# Altium PCB HCD_PCB.PcbDoc (part 4 of 4)
Units mil, origin at the board's own origin, x right, y up, seen from the top; angles counter-clockwise.
Board outline 2762.03 x 3428.03 mil, 2 copper layers (Top Layer, Bottom Layer), stack 57 mil thick; 112 components, 73 nets, 363 pads, 145 vias.
Unrouted connection lines stored in the file: 1.
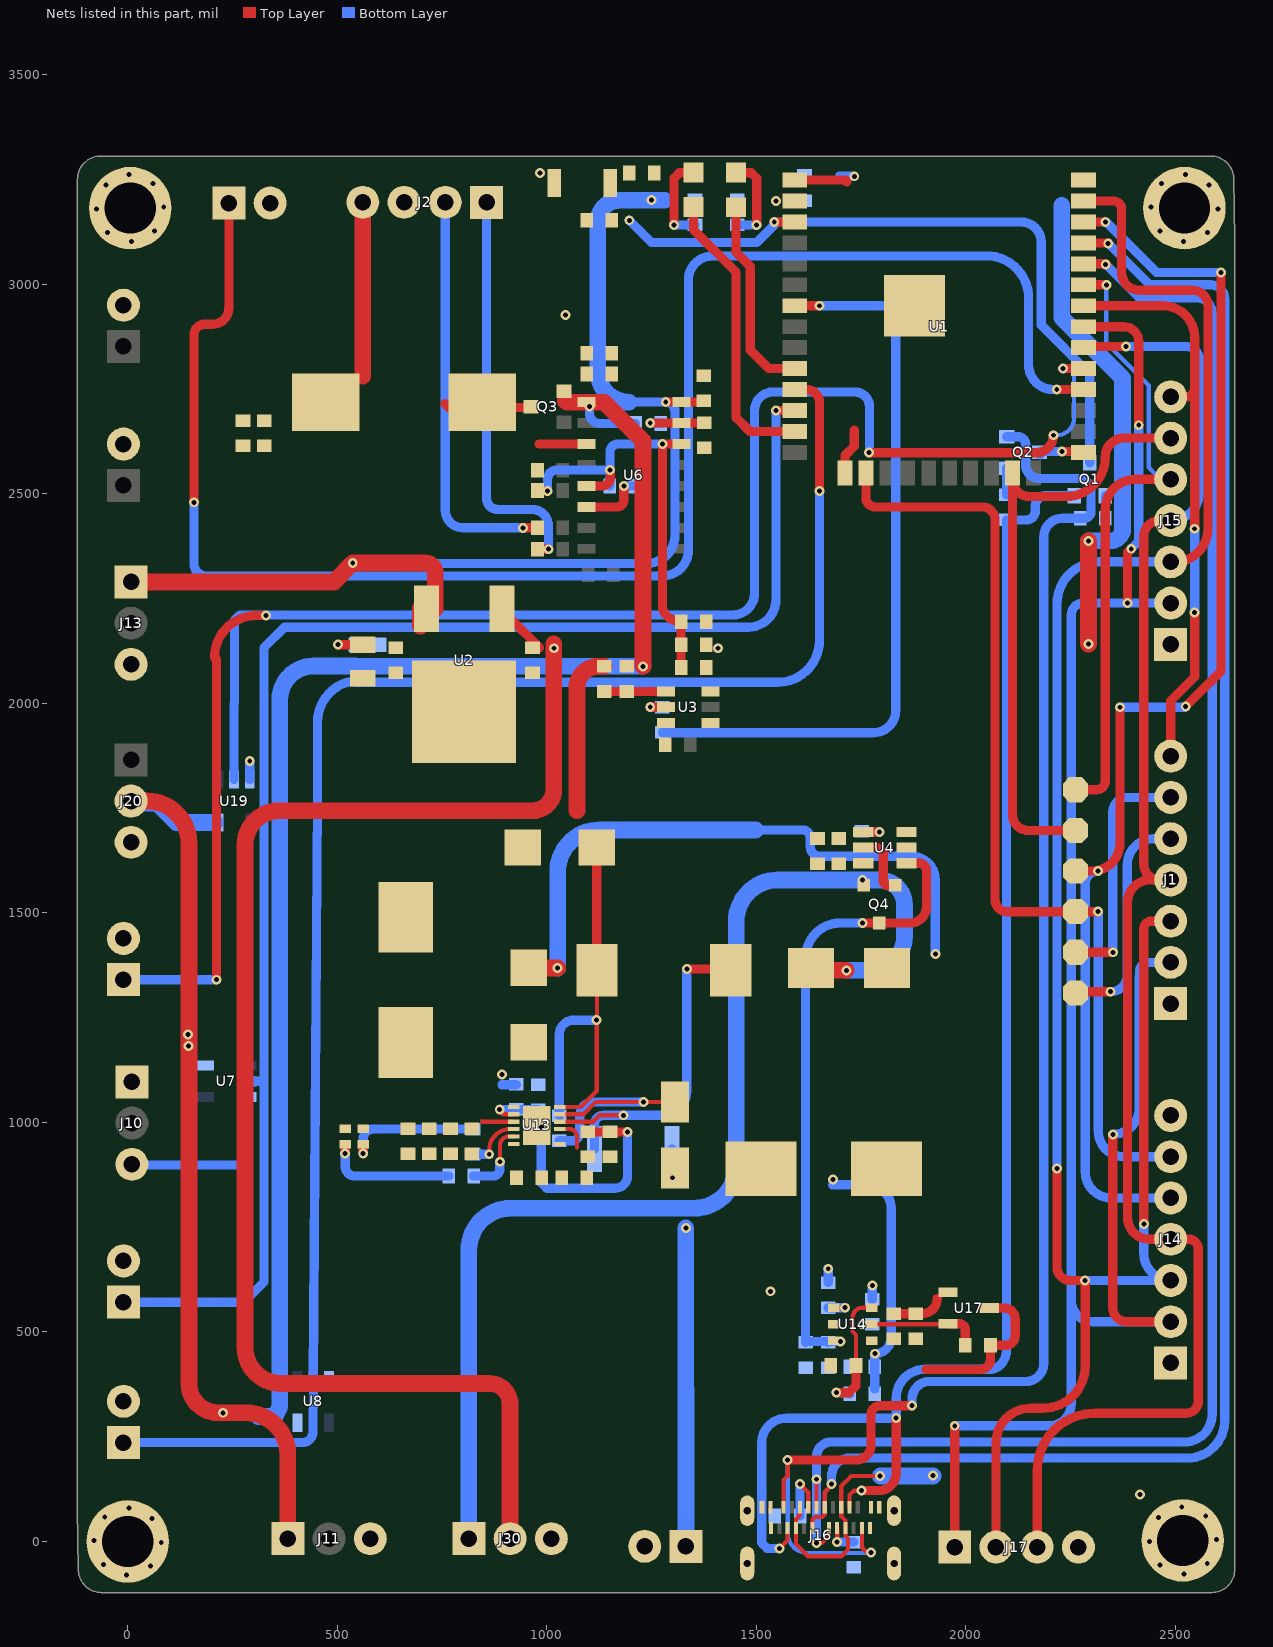
[diagram p2: the nets of this part, all layers, seen from the top]

## Via types
v1: diameter 23.62, hole 11.81, Top Layer to Bottom Layer, tented both sides, 100 vias
v2: diameter 23.62, hole 11.81, Top Layer to Bottom Layer, 45 vias

## Nets (pads, with @x,y where several pads share a name; then routed paths per layer and width w, separated by ;. In a path a pad name is that pad's centre, name@x,y a point inside that pad or via, vN(x,y) a via of type N, cw(c..) or ccw(c..) an arc to the next point about the centre after c; other vN are vias at no path point) (continued)
ACTUATOR2_SIG.Tx2: J27.1 U1.28 | length 4008.1
  Top Layer w22: v1(158,2480) 158,2879 cw(c184,2879) 184,2905 203.47,2905 ccw(c203.47,2942.58) 241.05,2942.58 ; 241.57,2942.58 J27.1@241.57,3191.19 ; v2(2217.19,2749) 2218,2749 U1.28@2281,2749
  Bottom Layer w22: v1(158,2480) 158,2334 ccw(c188,2334) 188,2304 1276,2304 ccw(c1276,2366) 1338,2366 1338,3010 cw(c1396,3010) 1396,3068 2050,3068 cw(c2050,2968) 2150,2968 2150,2808 ccw(c2209,2808) v2@2209,2749
AVDD: L1.1 Q3.3 R2.1 U6.3 | length 316.2
  Top Layer w22: 757.01,2716 765.61,2707.4 ccw(c766.61,2707.4) 766.61,2706.4 894.6,2706.4 Q3.3@956.26,2706.4 ; 982,2619 U6.3@1094.81,2619
AVDD#: C12.1 C13.1 J2.4 L1.2 | length 412.5
  Top Layer w40: 561,2780.54 J2.4@561,3193
BAT_RST: C42.1 R37.2 U14.5 U17.2 | length 310.5
  Top Layer w10: v1(1754,518) 1754.2,518.2 1775.8,518.2 U14.5@1776,518.41 U17.2@1957.76,518.41
  Top Layer w22: U17.2@1957.76,519.6 1984.4,519.6 cw(c1984.4,505) 1999,505 R37.2@1999,471
  Bottom Layer w22: v1(1754,518) C42.1@1777,518
BLE_IND: LED2.2 U1.13 | length 698.6
  Top Layer w22: LED2.2@1350,3184.66 1350,3131 1452,3029 1452,2681.94 1484.94,2649 U1.13@1592.02,2649
BOOT: C39.1 D3.1 U13.11 | length 558.9
  Top Layer w10: U13.11@1031.24,1019.43 1087.47,1019.43 1116.78,1048.74 1142.07,1048.74 1142.14,1048.81 1161.86,1048.81 1161.93,1048.74 v1(1231,1048.74) D3.1@1306,1048.74
  Bottom Layer w22: C39.1@1030,956 1059.9,956 ccw(c1059.9,975.1) 1079,975.1 1079,1017 cw(c1110.74,1017) 1110.74,1048.74 v1(1231,1048.74)
BUCK_EN: R13.2 U1.7 | length 1779.8
  Top Layer w22: U1.7@1592.02,2949 v2(1651,2949)
  Bottom Layer w22: R13.2@1276,1931 1277,1930 1780,1930 ccw(c1780,1983) 1833,1983 1833,2914.3 ccw(c1798.3,2914.3) 1798.3,2949 v2(1651,2949)
CHRG: R29.1 U13.4 | length 135.8
  Top Layer w10: v1(862.76,924) 862.76,934.56 cw(c912.21,934.56) 912.21,984 U13.4@921.76,984
  Bottom Layer w22: R29.1@824,924 v1@862,924
DTR: J16.A2 J16.B2 Q2.2 R3.2 | length 3825.5
  Top Layer w10: J16.A2@1565.16,81.21 1565.16,90.9 1565.24,90.98 1565.24,146.43 1575,156.19 v2(1575,194.13) ; J16.B2@1752.24,22.24 1752.24,-7.24 ccw(c1771.79,-7.24) 1771.79,-26.79 v2(1773.82,-26.79)
  Top Layer w22: v2(1575,194.13) 1738,194.13 ccw(c1738,229.95) 1773.82,229.95 1773.82,302 cw(c1795.79,302) 1795.79,323.97 v2(1872,323.97)
  Bottom Layer w10: v2(1575,194.13) 1575,20.57 ccw(c1623.42,20.57) 1623.42,-27.85 1772.76,-27.85 v2(1773.82,-26.79)
  Bottom Layer w22: v2(1872,323.97) 1872,340.38 cw(c1913.62,340.38) 1913.62,382 2144.06,382 ccw(c2144.06,423.94) 2186,423.94 2186,2396.56 cw(c2231.44,2396.56) 2231.44,2442 R3.2@2273,2442 2283.34,2442 ccw(c2283.34,2457.66) 2299,2457.66 2299,2506 ccw(c2268,2506) 2268,2537 2175.42,2537 cw(c2175.42,2569.42) 2143,2569.42 2143,2618.45 ccw(c2125.05,2618.45) 2125.05,2636.4 Q2.2@2097.63,2636.4
ENABLE: C3.1 Q1.3 R11.1 SW1.1 U1.3 | length 1687.9
  Top Layer w22: v1(1543,3149) U1.3@1592.02,3149 ; U1.3@1588.02,3153 U1.3@1592.02,3149 ; U1.3@1593.02,3148 U1.3@1592.02,3149
  Bottom Layer w22: v1(1197,3153) 1250.37,3099.63 1500.79,3099.63 1543,3141.84 v1(1543,3149) 2132,3149 cw(c2132,3101) 2180,3101 2180,2903 2296,2787 Q1.3@2296,2574.37
FAULT: R30.1 U13.5 | length 175
  Top Layer w10: v1(888.19,906.12) 888.76,906.69 888.76,946.83 cw(c908.22,946.83) 908.22,966.28 U13.5@921.76,966.28
  Bottom Layer w22: R30.1@826,872 871.52,872 ccw(c871.52,888.48) 888,888.48 v1@888,907
GATE: Q4.1 U4.5 | length 154.3
  Top Layer w22: U4.5@1755.43,1656 1790.11,1656 1803,1643.11 1803,1573 1809.92,1566.08 Q4.1@1831.4,1566.08
GND: C1.2 C3.2 C4.2 C5.2 C6.2 C7.2 C12.2 C13.2 C15.2 C16.2 C17.2 C21.1 C31.2 C32.2 C33.2 C34.2 C35.2 C36.2 C37.2 C38.2 C41.2 C42.2 C50.2 C51.2 C52.2 C53.2 CF1.2 CF2.2 CF3.2 D2.2 J1.7 J2.3 J3.2 J10.3 J11.3 J13.3 J14.7 J15.7 J16.A1 J16.A12 J16.B1 J16.B12 J16.G1 J16.G2 J16.S1 J16.S2 J16.S3 J16.S4 J17.4 J20.3 J24.2 J25.2 J26.2 J27.2 J28.2 J29.2 J30.3 LED3.2 pad.MH1 pad.MH2 pad.MH3 pad.MH4 R6.1 R7.1 R12.1 R28.1 R32.2 R77.1 R78.1 SB1.2 SW1.2 U1.1 U1.15 U1.32 U1.38 U1.39 U2.2 U3.1 U4.2 U4.3 U6.5 U6.14 U7.3 U8.3 U13.6 U13.13 U17.1 U19.3 | length 4412.6
  Top Layer w22: R7.1@981.85,2511.85 ccw(c981.85,2508) R7.1@978,2508 ccw(c979,2508) 979,2507 v1(1002,2507) ; U6.5@1094.81,2519 1132.68,2519 ccw(c1132.68,2538.25) 1151.93,2538.25 1151.93,2556.07 ccw(c1151,2556.07) v1(1151,2557) ; C35.2@1102.36,977 v1(1193,977) ; v1(1276,2619) 1276,2233.18 ccw(c1309.2,2233.09) 1285.72,2209.61 ccw(c1321,2244.89) C6.2@1321,2195 1320.56,2194.56 1320.56,2085.94 C15.2@1321,2085.5 ; v1@1279,2619 U6.14@1321.19,2619 ; U1.1@1592.02,3249 1712,3249 cw(c1712,3245) 1716,3245 ; U1.15@1710,2548.08 cw(c1711.71,2548.08) U1.15@1711.71,2549.79 1711.71,2591.71 1734,2614 1734,2652 ; C51.2@1828,543.46 C50.2@1881,543.46 1895.46,543.46 ccw(c1895.46,580) 1932,580 ; U1.32@2281,2949 2470,2949 cw(c2470,2872.63) 2546.37,2872.63 v1(2546.37,2416.85) ; J1.7@2489,1874.04 2489,2006 2546.37,2063.37 v1(2546.37,2217) ; J15.7@2489,2731.55 2524.92,2731.55 ccw(c2524.92,2753) 2546.37,2753
  Top Layer w40: 1072,1744 1072,2037 cw(c1123.4,2037) 1123.4,2088.4 R12.1@1137,2088.4
  Bottom Layer w22: J10.3@10,900.15 12.03,898.12 258.36,898.12 ccw(c258.36,926.94) 287.18,926.94 U7.3@287.18,1060.6 ; U19.3@291.2,1818.18 v2(291.2,1862.56) ; v1@987.16,988.71 987.6,988.27 987.6,987.25 987.14,986.8 987.14,855.89 1000.03,843 1163,843 ccw(c1163,873) 1193,873 v1(1193,977) ; v1(1002,2507) 1002,2534.83 cw(c1024.17,2534.83) 1024.17,2557 v1(1151,2557) ; C21.1@1150,2519 ccw(c1150,2520) 1151,2520 v1(1151,2557) ; v1(1276,2619) 1169.75,2619 ccw(c1169.75,2600.25) 1151,2600.25 v1(1151,2557) ; v1@1670.86,650.82 cw(c1670.86,649.82) 1671.86,649.82 R32.2@1671.86,617.82 ; 1699,3258 v1(1734,3258) ; v1@1776,611 cw(c1776,610) 1777,610 C42.2@1777,578 ; v1(2546.37,2217) v1(2546.37,2416.85)
  other v1: -2.51,-80 2520.51,-77.49 54.8,-58.34 2463.2,-55.83 -58.34,-54.8 2576.34,-52.29 80,-2.51 2438,0 -80,2.51 2598,5.01 58.34,54.8 2459.66,57.3 -54.8,58.34 2572.8,60.85 2.51,80 2515.49,82.51 2416,112 1534,597 1777,611 1671.86,650.82 987.91,988.71 8.51,3102 2519.49,3102 -48.8,3123.66 2576.8,3123.66 64.34,3127.2 2463.66,3127.2 -74,3179.49 2602,3179.49 86,3184.51 2442,3184.51 -52.34,3236.8 2580.34,3236.8 60.8,3240.34 2467.2,3240.34 3.49,3262 2524.51,3262 984,3266
IN_NA: J2.2 R9.1 | length 980.9
  Top Layer w22: v1(943,2419) 978.12,2419 ccw(c975.12,2419) R9.1@975.12,2422
  Bottom Layer w22: J2.2@757.85,3193 757.85,2461.15 ccw(c800,2461.15) 800,2419 v1(943,2419)
IN_PA: J2.1 R10.1 | length 970.5
  Top Layer w22: R10.1@978.12,2368 v1(1004,2368)
  Bottom Layer w22: J2.1@856.28,3193 856.28,2489.53 ccw(c882.8,2489.53) 882.8,2463 965,2463 cw(c965,2424) 1004,2424 v1(1004,2368)
IO_0: Q2.3 U1.25 | length 119.4
  Top Layer w22: v1(2230,2601) 2279,2601 cw(c2279,2599) U1.25@2281,2599
  Bottom Layer w22: Q2.3@2177.37,2593.49 cw(c2181.56,2593.49) 2181.56,2597.69 2177.68,2597.69 cw(c2177.68,2599) Q2.3@2176.37,2599 cw(c2178.37,2599) 2178.37,2601 v1(2230,2601)
LED1: LED1.2 U1.10 | length 479.3
  Top Layer w22: LED1.2@1452,3184 1452,3076.19 1485.58,3042.6 1485.58,2843.42 1517.11,2811.89 1530,2799 U1.10@1592.02,2799
MISO: J1.2 J14.2 J15.2 J17.1 U1.31 | length 4868.4
  Top Layer w22: J17.1@1973.72,-13.39 v2(1973.72,276) ; U1.31@2281,2899 2377.1,2899 cw(c2377.1,2863.29) 2412.81,2863.29 v1(2412.81,2663.94) ; v2(2351,971.46) 2351,557.24 ccw(c2383.83,557.24) 2383.83,524.41 J14.2@2489,524.41 ; v1(2386,2239.43) 2386,2359.56 2395,2368.56 v1(2395,2369)
  Bottom Layer w22: v2(1973.72,276) 2198.97,276 ccw(c2198.97,329.03) 2252,329.03 2252,575.03 ; v2(2351,971.46) ccw(c2351,1034.31) 2413.85,1034.31 2413.85,1343.15 ccw(c2345.81,1351.52) 2414.37,1351.52 2414.37,1359.37 cw(c2436.37,1359.37) 2430.68,1380.63 cw(c2440.43,1344.49) 2440.43,1381.92 J1.2@2489,1381.92 ; v1(2395,2369) 2395,2369.44 2412.81,2387.25 v1(2412.81,2663.94) ; J14.2@2489,524.41 2302.62,524.41 cw(c2302.62,575.03) 2252,575.03 ; J15.2@2489,2239.43 v1(2386,2239.43) 2280,2239.43 ccw(c2280,2211.43) 2252,2211.43 2252,575.03
MOSI: J1.3 J14.3 J15.3 J17.2 U1.37 | length 5091.3
  Top Layer w22: J17.2@2072.15,-13.39 2072.15,235 cw(c2155.15,235) 2155.15,318 2185,318 ccw(c2185,418) 2285,418 v2(2285,622.83) 2249.17,622.83 cw(c2249.17,654) 2218,654 v1(2218,890) ; U1.37@2281,3199 2352,3199 cw(c2352,3179) 2372,3179 2372,3028.56 ccw(c2414.45,3028.56) 2414.45,2986.11 2541,2986.11 cw(c2541,2949.11) 2578,2949.11 2578,2416.85 cw(c2499,2416.85) 2499,2337.85 J15.3@2489,2337.85 ; v2(2425.04,758) 2425,1462.6 cw(c2442.74,1462.6) 2442.74,1480.34 J1.3@2489,1480.34
  Bottom Layer w22: v1@2218,891 2218,2237.85 cw(c2318,2237.85) 2318,2337.85 J15.3@2489,2337.85 ; v2(2285,622.83) J14.3@2489,622.83 cw(c2489,686.79) 2425.04,686.79 v2(2425.04,758)
NetC11_2: C11.2 U3.6
NetC21_2: C21.2 U6.6 | length 159.5
  Top Layer w22: U6.6@1094.81,2469 1168.34,2469 ccw(c1168.34,2484.66) 1184,2484.66 v1(1184,2519)
  Bottom Layer w22: v1@1183,2519 v1(1184,2519) C21.2@1210,2519
NetD4_2: D4.2 R29.2 | length 329.8
  Top Layer w22: v1(562,926) D4.2@562,946
  Bottom Layer w22: v1(562,926) 562,960.2 cw(c585.8,960.2) 585.8,984 R29.2@824,984
NetD5_2: D5.2 R30.2 | length 312
  Top Layer w22: v1(519,926) D5.2@519,947
  Bottom Layer w22: v1(519,926) 519,895.32 ccw(c542.32,895.32) 542.32,872 R30.2@766,872
NetJ16_A5: J16.A5 R77.2 | length 139.7
  Top Layer w10: v2(1604.53,136.81) 1624.21,117.13 J16.A5@1624.21,81.21
  Bottom Layer w22: R77.2@1604.53,60.85 v2(1604.53,136.81)
NetJ16_B5: J16.B5 R78.2 | length 73
  Top Layer w10: J16.B5@1693.11,32 J16.B5@1693.11,32 1693.15,-1.15 v2(1693.19,-1.19)
  Bottom Layer w22: v2(1693.19,-1.19) R78.2@1733,-1.19
NetLED1_1: LED1.1 R1.1 | length 212.5
  Top Layer w22: LED1.1@1452,3266.34 1488.11,3266.34 1501,3253.45 v2(1501,3142) v2@1501,3141.25
  Bottom Layer w22: R1.1@1455,3142 v2(1501,3142)
NetLED2_1: LED2.1 R15.1 | length 212.8
  Top Layer w22: v2(1304,3142) 1304,3253.45 1316.89,3266.34 LED2.1@1350,3266.34
  Bottom Layer w22: v2(1304,3142) R15.1@1354,3142
NetLED3_1: LED3.1 R16.1 | length 59.2
  Top Layer w22: v2(502,2140.25) 502,2140 LED3.1@561,2140
NetQ1_1: Q1.1 R3.1 | length 55
  Bottom Layer w22: R3.1@2331,2442 ccw(c2331,2444.4) 2333.4,2444.4 Q1.1@2333.4,2495.63
NetQ2_1: Q2.1 R4.1 | length 64.2
  Bottom Layer w22: R4.1@2097,2498 2097.63,2498 Q2.1@2097.63,2561.6
NetR8_2: R8.2 R12.2 U3.4 | length 147.9
  Top Layer w22: R12.2@1137,2028.4 R8.2@1191,2028.4 U3.4@1284.85,2028.4
NetR13_1: R13.1 U3.5 | length 75.4
  Top Layer w22: v2(1247,1991) U3.5@1284.85,1991 U3.5@1284.04,1991.81
  Bottom Layer w22: v2(1247,1991) R13.1@1276,1991 1280.38,1991 R13.1@1282.5,1993.12
NetR14_1: R14.1 U4.4 | length 81.5
  Top Layer w22: U4.4@1755.43,1693.4 v2(1794,1693.4)
  Bottom Layer w22: R14.1@1752,1695 ccw(c1753.6,1695) 1753.6,1693.4 v2(1794,1693.4)
NetR32_1: R32.1 U14.1 | length 67.3
  Top Layer w10: U14.1@1684.46,557.82 v1(1711.83,557.82)
  Bottom Layer w22: R32.1@1671.86,557.82 v1(1711.83,557.82)
R_PULL: C54.2 R36.1 U14.6 | length 312.1
  Top Layer w10: C54.2@1738,420 1738,493 1730,501 1730,533.83 cw(c1753.98,533.83) 1753.98,557.82 U14.6@1776,557.82
  Top Layer w22: v2(1691,355) 1721.06,355 1738,371.94 C54.2@1738,420
  Bottom Layer w22: v2(1691,355) 1720.16,355 R36.1@1723,352.16
RFID_SIG.RST1: J14.5 P1.1 U1.36 | length 3042.8
  Top Layer w22: P1.1@2262,1600 2301.74,1600 ccw(c2301.74,1666.26) 2368,1666.26 v2(2368,1990.88) ; U1.36@2281,3149 v1@2328,3149 ; v2(2524.92,1993) 2609,2077.08 v1(2609,3028.56)
  Bottom Layer w22: v2(2316,1600) ccw(c2316,1569) 2285,1569 2285,881.89 ccw(c2347.2,881.89) 2347.2,819.69 J14.5@2489,819.68 ; v1@2335,3149 2455.44,3028.56 v1(2609,3028.56) ; v2(2368,1990.88) 2522.8,1990.88 v2(2524.92,1993)
  other v1: 2333,3149
RFID_SIG.RST2: J15.5 P2.1 U1.33 | length 1525.2
  Top Layer w22: P2.1@2262,1794 2312,1794 ccw(c2312,1815) 2333,1815 2333,2463 cw(c2404.7,2463) 2404.7,2534.7 J15.5@2489,2534.7 ; U1.33@2281,2999 v1(2336,2999)
  Bottom Layer w10: v1@2335.2,2998.13 2335.2,2860.06 2338.12,2857.13 2436.62,2758.63 2436.62,2563.32 2452.08,2547.85 2475.85,2547.85 J15.5@2489,2534.7
  Bottom Layer w22: v1@2335.2,2998.13 v1(2336,2999)
RFID_SIG.RST3: J1.5 P5.1 | length 549.3
  Top Layer w22: P5.1@2262,1309 2264.96,1311.96 v2(2345.81,1311.96)
  Bottom Layer w22: v2(2345.81,1311.96) ccw(c2345.81,1351.52) 2385.37,1351.52 2385.37,1613.85 cw(c2448.71,1613.85) 2448.71,1677.19 J1.5@2489,1677.19
RFID_SIG.SCK: J1.4 J14.4 J15.4 J17.3 U1.30 | length 3776.6
  Top Layer w22: J17.3@2170.57,-13.39 2170.57,168.66 cw(c2307.91,168.66) 2307.91,306 2526.35,306 ccw(c2526.35,334.65) 2555,334.65 ; U1.30@2281,2849 2284,2852 v1(2382,2852) ; J1.4@2478.14,1578.77 J1.4@2462.49,1578.77 ; J1.4@2478.14,1589.62 J1.4@2489,1578.77 ; J15.4@2478.14,2425.42 J15.4@2489,2436.28 ; J15.4@2478.14,2436.28 2462.49,2436.28 ccw(c2462.49,2398.79) 2425,2398.79 2425,1616.26 ccw(c2462.49,1616.26) J1.4@2462.49,1578.77 ; 2555.03,334.65 2555.03,697.83 ccw(c2531.61,697.83) 2531.61,721.26 J14.4@2489,721.26 2438.31,721.26 cw(c2438.31,773.57) 2386,773.57 2386,1524.97 cw(c2439.8,1524.97) 2439.8,1578.77 J1.4@2462.49,1578.77
  Bottom Layer w22: v1(2382,2852) 2524.47,2852 2524.51,2851.96 cw(c2524.51,2818.47) 2558,2818.47 2558,2505.28 cw(c2489,2505.28) J15.4@2489,2436.28
RFID_SIG.SS1: J14.6 P3.1 U1.16 | length 2298
  Top Layer w22: U1.16@1761.71,2549.79 1761.71,2490.82 ccw(c1783.53,2490.82) 1783.53,2469 2039.27,2469 cw(c2039.27,2438.27) 2070,2438.27 2070,1531 ccw(c2098,1531) 2098,1503 P3.1@2262,1503 v2(2316,1503)
  Bottom Layer w22: v2(2316,1503) 2316,979.7 ccw(c2377.59,979.7) 2377.59,918.11 J14.6@2489,918.11
RFID_SIG.SS2: J15.6 P4.1 U1.23 | length 1475.4
  Top Layer w22: U1.23@2111.71,2549.79 U1.23@2111.71,2533.29 ; P4.1@2270.41,1697 2149,1697 cw(c2149,1734.29) 2111.71,1734.29 U1.23@2111.71,2533.29 ; J15.6@2489,2633.13 2377.1,2633.13 ccw(c2377.1,2589.03) 2333,2589.03 2333,2587.29 cw(c2239.71,2587.29) 2239.71,2494 2151,2494 cw(c2151,2533.29) U1.23@2111.71,2533.29
RFID_SIG.SS3: J1.6 P6.1 | length 581.9
  Top Layer w22: P6.1@2262,1406 v2(2351,1406)
  Bottom Layer w22: v2(2351,1406) 2351,1741.25 cw(c2385.37,1741.25) 2385.37,1775.62 J1.6@2489,1775.62
RT#: RF1.1 SB1.1 U6.15 | length 159.4
  Top Layer w22: v1(1247,2669) U6.15@1321.19,2669 SB1.1@1381,2669
  Bottom Layer w22: v1(1247,2669) 1271,2669 RF1.1@1272,2668
RTS: J16.A10 J16.B10 Q1.2 R4.2 | length 3547.1
  Top Layer w10: v2(1555.31,-16.73) 1574.92,2.87 J16.B10@1574.92,22.24 ; J16.A10@1722.64,81.21 1722.64,110.92 1732.48,120.76 1750.87,120.76 v2(1751.48,121.37)
  Top Layer w22: v2(1751.48,121.37) 1791.78,121.37 ccw(c1791.78,163.59) 1834,163.59 v2(1834,294.16)
  Bottom Layer w22: v2(1555.31,-16.73) 1528.37,-16.73 cw(c1528.37,-1.64) 1525.97,-16.54 1513.47,-4.04 cw(c1528.37,-1.64) 1513.28,-1.64 1513.28,93.02 ccw(c1478.54,93.02) 1513.11,96.44 cw(c1535,98.61) 1513,98.61 1513,235.51 1513,235.62 cw(c1571.65,235.51) 1571.65,294.16 v2(1834,294.16) 1834,342 cw(c1903,342) 1903,411 2026,411 2060.59,411 ccw(c2060.59,433) 2069.31,412.8 ccw(c2051,455) 2097,455 R4.2@2097,2438 2145,2438 ccw(c2145,2459) 2166,2459 2166,2470.93 cw(c2190.7,2470.93) 2190.7,2495.63 Q1.2@2258.6,2495.63
RXD: J16.A6 J16.B6 U1.34 | length 4322.3
  Top Layer w10: v2(1643.9,-4.04) 1656.67,-4.04 1673.43,12.72 J16.B6@1673.43,32 ; J16.A6@1643.9,81.21 v2(1643.9,148.46)
  Top Layer w22: U1.34@2281,3049 2334.68,3049 v1@2336,3047.69
  Bottom Layer w22: v2(1643.9,-4.04) v2(1643.9,148.46) 1644,148.56 1644,202.53 cw(c1678.47,202.53) 1678.47,237 2521.04,237 ccw(c2521.04,304) 2588.04,304 2588.04,2930.96 ccw(c2551,2930.96) 2551,2968 2413.68,2968 v1(2334,3047.69)
SENSE: L2.1 R26.2 U13.10 | length 880
  Top Layer w10: U13.10@1032,1001.72 1110.56,1001.72 1125.85,1017 v1(1182.76,1017)
  Top Layer w22: v1(1334.55,1366) 1434,1366 ccw(c1434,1371) L2.1@1439,1371
  Bottom Layer w22: R26.2@1113.96,936.48 1114,995.06 cw(c1135.94,995.06) 1135.94,1017 1182,1017 1277,1017 ccw(c1277,1074) 1334,1074 v1@1334,1366
SENSOR_SIG.SNS_1: J29.1 U1.11 U8.2 | length 4100.5
  Top Layer w22: U1.11@1592.02,2749 1620,2749 cw(c1620,2718) 1651,2718 v1(1651,2507)
  Bottom Layer w22: J29.1@-4.19,236 416.56,236 ccw(c416.56,261.74) 442.29,261.74 443.11,374.07 U8.2@443,374.18 ; U8.2@442.92,384.18 442.93,385.61 453,1771.64 453,1955 cw(c553,1955) 521.46,2049.9 cw(c528.34,2029) 528.41,2051 538.46,2051 cw(c538.46,2029) 541.5,2050.79 541.74,2050.76 ccw(c546.92,2088.4) 546.92,2050.4 1551,2050.4 ccw(c1551,2150.4) 1651,2150.4 v1(1651,2507)
SENSOR_SIG.SNS_2: J24.1 U1.12 U7.2 | length 3688
  Top Layer w22: v1(1547,2699) U1.12@1592.02,2699
  Bottom Layer w22: J24.1@-5.19,571 277.08,571 325,618.92 325,1107.89 ; U7.2@287.18,1098 325,1098 325,2133 374,2182 1481.36,2182 ccw(c1481.36,2247.64) 1547,2247.64 v1(1547,2699)
SENSOR_SIG.SNS_3: J25.1 U1.29 U19.2 | length 4419.6
  Top Layer w22: v2(212,1340.57) 212,2104.61 207,2109.61 cw(c307,2109.61) 307,2209.61 v2(330,2209.61) ; v1@1769.19,2598 2167,2598 ccw(c2167,2640) 2189,2604.22 ccw(c2167,2640) v1(2209,2640) ; v1(2232,2799) U1.29@2281,2799
  Bottom Layer w10: v1(2209,2640) 2217,2640 ccw(c2217,2681.6) 2258.6,2681.6 2258.6,2790.54 2252.74,2796.39 2234.61,2796.39 v1(2232,2799)
  Bottom Layer w22: J25.1@-10.19,1340.57 v2(212,1340.57) ; U19.2@253.8,1818.18 253.8,1999 255,2000.2 255,2198.11 267.89,2211 1444.25,2211 ccw(c1444.25,2262.75) 1496,2262.75 1496,2699 cw(c1540,2699) 1540,2743 1736,2743 cw(c1736,2709) 1770,2709 v1@1770,2599
  other v1: 1769.19,2599.02
SW: C39.2 D2.1 L2.2 U13.12 | length 1004.1
  Top Layer w10: U13.12@1031.24,1037.15 1081.15,1037.15 1119.55,1075.55 v1@1119.55,1244 ; v1@1120.1,1244 L2.2@1120.1,1371
  Top Layer w22: L2.2@1120.1,1363 1119.55,1363.55 1119.55,1662.97 D2.1@1121.58,1665
  Bottom Layer w22: C39.2@1030,1016 1030,1209.86 cw(c1064.14,1209.86) 1064.14,1244 v1@1118,1244
  other v1: 1118.55,1244
TXD: J16.A7 J16.B7 U1.35 | length 4235
  Top Layer w10: J16.B7@1634.06,32 1634.06,52.51 1639.91,58.37 1657.72,58.37 1663.58,64.22 J16.A7@1663.58,81.21 1663.58,117.51 1679.7,133.63 v2(1679.7,137.32)
  Top Layer w22: U1.35@2281,3099 v1@2333.68,3099
  Bottom Layer w22: v2(1679.7,137.32) 1679.7,155.52 cw(c1723,155.52) 1723,198.82 2528.43,198.82 ccw(c2528.43,288.39) 2618,288.39 2618,2965.58 ccw(c2584.58,2965.58) 2584.58,2999 2439,2999 v1(2340,3098)
VBAT: C52.1 C53.1 C54.1 Q4.3 U4.1 U14.2 U14.3 | length 1506.3
  Top Layer w22: v1@1753.6,1475.92 Q4.3@1794,1475.92 1867.74,1475.92 ccw(c1867.74,1514.19) 1906,1514.19 1906,1602 ccw(c1889.4,1602) 1889.4,1618.6 U4.1@1858.57,1618.6
  Bottom Layer w22: C53.1@1671.86,475 C53.1@1671.86,477 ; v1(1701,477) C53.1@1671.86,477 ; v1(1753.6,1476) 1701,1476 ccw(c1701,1392.86) 1617.86,1392.86 C52.1@1617.86,475 cw(c1619.86,475) 1619.86,477 C53.1@1671.86,477
VBAT_IN: C35.1 C36.1 C37.1 C41.1 C50.1 C51.1 D3.2 J3.1 R26.1 R27.1 R36.2 R37.1 U13.9 U14.4 U17.3 | length 1921.3
  Top Layer w10: U13.9@1031.24,984 1055.07,984 cw(c1055.07,967.07) 1072,967.07 1072,940
  Top Layer w22: 1905,410 2034,410 ccw(c2034,435) 2059,435 R37.1@2059,468 2095.06,468 ccw(c2095.06,490.94) 2118,490.94 2118,531 ccw(c2092,531) 2092,557 U17.3@2056.19,557
  Bottom Layer w22: v1@1299,868 R26.1@1299,936.48 ; 1682,851 1766.22,851 cw(c1766.22,795.22) 1822,795.22 1822,487 cw(c1783,487) v1(1783,448) C41.1@1783,417 R36.2@1783,364
  Bottom Layer w40: v2(1332,748.22) J3.1@1332.21,-11.66
  other v1: 1682.76,864 1299.76,868
VBUS_12V: D1.2 D6.1 J16.A4 J16.A9 J16.B4 J16.B9 R14.2 | length 2150.2
  Top Layer w10: J16.B9@1594.69,32 1594.69,-6.47 1623.69,-35.47 1703.05,-35.47 1719.21,-19.31 1719.21,6.89 1712.87,13.23 1712.87,31.92 J16.B4@1712.8,32 1712.72,32.08 1712.72,49.7 1703.03,59.38 1703.03,81.13 J16.A9@1702.95,81.21 1702.95,132.19 1726.95,156.19 v2(1795.79,156.19) ; J16.B9@1594.84,32.16 1594.84,53.91 1604.53,63.59 J16.A4@1604.53,81.21
  Top Layer w40: D1.2@940,1368.58 D1.2@957,1368.58 v1(1026,1368.58)
  Bottom Layer w22: 1498,1698 1609.9,1698 cw(c1609.9,1678.9) 1629,1678.9 1629,1658 ccw(c1652,1658) 1652,1635 1871.18,1635 cw(c1871.18,1578.77) 1927.41,1578.77 v1(1927.41,1402)
  Bottom Layer w40: v1(1026,1368.58) 1026,1598 cw(c1126,1598) 1126,1698 1498,1698 ; v2(1795.79,156.19) 1921.19,156.19 ccw(c1921.19,157) v2(1922,157)
VCC: C4.1 C6.1 C7.1 C15.1 J30.2 R16.2 U2.1 U3.3 | length 3494.4
  Top Layer w22: U2.1@910,2205.62 C4.1@983,2132.62
  Top Layer w40: J30.2@912.57,6.53 912.57,327.39 ccw(c862.97,327.39) 862.97,377 366,377 cw(c366,463) 280,463 280,1662.76 cw(c361.24,1662.76) 361.24,1744 966,1744 ccw(c966,1795) 1017,1795 v2(1017,2131.61) v2@1017,2142.11
  Bottom Layer w22: v2@1020,2131.61 v2@1020.44,2131.61 ; v1@1408.54,2132 v1(1408.93,2131.61)
VCC_3V3: C1.1 C5.1 CF3.1 J1.1 J13.1 J14.1 J15.1 R1.2 R11.2 R15.2 U1.2 U2.3 U6.16 | length 4048.3
  Top Layer w22: v1(1284,2719) U6.16@1321.19,2719 1372,2719 ccw(c1372,2722) CF3.1@1375,2722
  Top Layer w40: J13.1@13,2290 492,2290 v1(537,2335) 710,2335 cw(c710,2311) 734,2311 U2.3@734,2225.22 ; U2.3@699,2184.51 U2.3@699,2226.73 ; v1(2293,2142) v1(2293,2388)
  Bottom Layer w22: v1(537,2335) ccw(c538,2335) 538,2334 1239,2334 ccw(c1239,2401) 1306,2401 1306,2697 ccw(c1284,2697) v1(1284,2719) 1196.3,2719 ; 1281,3203 cw(c1281,3196) 1288,3196
  Bottom Layer w40: 1196.3,2719 cw(c1196.3,2793.3) 1122,2793.3 1122,3149 cw(c1174,3149) 1174,3201 v1(1250.37,3201) 1281,3201 ; 2229,3188.97 2229,2921 2374,2776 2374,2410.32 cw(c2345,2418) 2345,2388 v1(2293,2388)
  other v1: 1547,3199
VCC_5V: CF1.1 CF2.1 J10.1 J11.1 J20.2 Q3.2 R8.1 RF1.2 U6.1 U7.5 U8.5 U19.5 | length 5795.9
  Top Layer w40: J20.2@14,1767 46,1767 cw(c46,1667) 146,1667 146,377 ccw(c216,377) 216,307 v2(227,307) 282.15,307 cw(c282.15,207) 382.15,207 J11.1@382.15,6.53 ; 1045,2722 1048,2719 1137,2719 1230,2626 v1(1230,2088.4)
  Bottom Layer w22: v1(1102,2709) 1102,2692.49 ccw(c1126.49,2692.49) 1126.49,2668 RF1.2@1212,2668
  Bottom Layer w40: J20.2@15,1767 20.17,1761.83 70.36,1761.83 116.36,1715.82 U19.5@208,1715.82 ; 311.78,298.08 323,298.08 351.59,298.08 363,321.51 363,2009 cw(c443,2009) 443,2089 542.17,2089 cw(c538.82,2049.14) 544.38,2088.75 546.92,2088.4 v1(1230,2088.4)
  other v1: 1045,2927
  other v2: 145,1182 144.1,1209.86
VCC_IN: C16.1 C17.1 D6.2 J30.1 Q4.2 U4.6 | length 2863.5
  Top Layer w40: D6.2@1631,1368.58 1636.59,1363 v1(1715,1363)
  Bottom Layer w40: J30.1@814.15,6.53 814.15,695.22 cw(c914.15,695.22) 914.15,795.22 1352,795.22 ccw(c1352,895.22) 1452,895.22 1452,1478.77 cw(c1552,1478.77) 1552,1578.77 v2(1753.6,1578.77) 1794,1578.77 cw(c1794,1518.77) 1854,1518.77 1854,1445 cw(c1772,1445) 1772,1363 v1(1715,1363)
VFB: R27.2 R28.2 U13.7
VIN_1: C31.1 C32.1 C33.1 C34.1 C38.1 D1.1 D4.1 D5.1 R5.1 U13.1 U13.3 | length 109.7
  Top Layer w10: 846,1003 ccw(c847.28,1003) 847.28,1001.72 U13.3@921,1001.72
  Bottom Layer w22: 893,1090 R5.1@927,1090
  other v1: 893,1114
VIN_REG: R5.2 R6.2 U13.2 | length 133.2
  Top Layer w10: v1(887.76,1031) ccw(c899.33,1031) 899.33,1019.43 U13.2@921.76,1019.43 ; v1@893.17,1029 v1@894.76,1029
  Bottom Layer w22: v1@889,1031 R6.2@980,1031
pads on no net: J16.A3 J16.A8 J16.A11 J16.B3 J16.B8 J16.B11 U1.4 U1.5 U1.14 U1.17 U1.18 U1.19 U1.20 U1.21 U1.22 U1.24 U1.26 U6.9 U6.10 U6.13 U7.1 U8.1 U13.8 U19.1

## Polygon pours and split planes (outlines as drawn)
no net on Mechanical 2 (solid, shelved): 315,-21
GND on Top Layer "Polygon_1" (hatched 45Degree grid 25 track 15, remove dead copper, shelved, pour order 14): -14,-9.18 ccw(c-13,-9.18) -13,-10.18 2437,-10.18 ccw(c2437,89.82) 2537,89.82 2537,3196 cw(c2540,3196) 2540,3199 -14,3199 ccw(c-14,3197) -16,3197 -16,3058 ccw(c-14,3058) -14,3056
no net on Top Layer "Top Layer-No Net" (none, shelved, pour order 6): -120.02,-64.49 ccw(c-65,-64.49) -65,-119.5 55.58,-119.5 ccw(c55.58,-114.49) 57.77,-119 ccw(c0,0) 132.28,0 ccw(c0,0) -117.83,60.12 ccw(c-115,55.98) -120.02,55.98
GND on Bottom Layer "Polygon_2" (hatched 45Degree grid 25 track 15, remove dead copper, shelved, pour order 16): -13,-7.18 ccw(c-12,-7.18) -12,-8.18 2438,-8.18 ccw(c2438,91.82) 2538,91.82 2538,3198 cw(c2541,3198) 2541,3201 -13,3201 ccw(c-13,3199) -15,3199 -15,3060 ccw(c-13,3060) -13,3058
no net on Bottom Layer "Bottom Layer-No Net" (solid, shelved, pour order 8): 140,3123

## Other copper
Top Layer:
  rectangle net GND: 241,2555.12 351,2629.92
  rectangle net VCC_5V: 1168.34,2060 1257,2115.61
  rectangle net VBUS_12V: 1895.46,117 1949,371.94
  rectangle net GND: 330,1403 794,1509
  rectangle net GND: 330,1457 987,1703
  rectangle net GND: 280,1803 987,2103
  rectangle net VCC: 862,2115.61 1037,2296.61
  rectangle net GND: 1795.79,-108.24 1872,45.91
  rectangle net GND: 1771.85,14.35 1872,98.74
  rectangle net GND: 1500,-108.24 1811,-53
  region net GND: 1535.63,98.74 1435.48,98.74 1435.48,-108.24 1535.63,-108.24
  rectangle net VBUS_12V: 2143,346.46 2199,1266
  rectangle net VBUS_12V: 1895.46,346.46 2169,384.85
  rectangle net VBAT_IN: 1763.54,398.29 1931.19,501
  rectangle net GND: 2447,971.49 2593,1063.75
  rectangle net GND: 2447,1829 2593,1921.26
  rectangle net VCC_3V3: 1530,3179.49 1630,3220.95
  rectangle net GND: 1263,2593.71 1399,2640
  rectangle net ENABLE: 1126.68,3135.71 1213,3294.71
  rectangle net AVDD#: 241,2643 581.43,2797
  rectangle net AVDD: 659.43,2536 993,2797
  rectangle net "#V FB": 1022,2485.66 1058,2580
  rectangle net VCC_5V: 1004,2699 1113,2949
  region net VCC_3V3: 778,2296.61 612,2296.61 612,2115.61 778,2115.61
  rectangle net NetC11_2: 1257,1883 1310,1969
  region net VCC: 1412.3,2249 1361.3,2249 1361.3,2013 1412.3,2013
  rectangle net VCC_IN: 1620,1542 1783.53,1635.61
  rectangle net VIN_1: 326,973 862,1391
  rectangle net GND: 811,654 957,885
  rectangle net VFB: 1016,845 1052.57,954
  rectangle net GND: 1370,1719 1421,1969
  rectangle net VBUS_12V: 1753.98,1251 2199,1424
  rectangle net GND: 1052.57,1719 1865,1755
  rectangle net GND: 1827,1643 2034,1755
  rectangle net GND: 1446,579 2098,675
  rectangle net GND: 1723,633 2098,1208
  rectangle net VBAT: 1584,402 1715,533
  rectangle net VIN_1: 907,1037.15 935,1076
  rectangle net GND: 907,866 957,954
  rectangle net VFB: 966,845 1046,933
  rectangle net GND: 591,654 842,954
  rectangle net VBAT_IN: 1389,792 1702,1123.03
  rectangle net VBAT_IN: 1060,685 1702,943
  rectangle net VIN_1: 572,1055 1009,1280
  rectangle net GND: 1090,2969 1304,3085
  rectangle net GND: 1131,2748 1412.3,2985
  rectangle net GND: 915,2969 1113,3294.71
  rectangle net GND: 2574,218 2633.52,1921.26
  rectangle net GND: 2381,-118 2543,-21
  rectangle net GND: 2381,-66 2634,276
  rectangle net GND: 2201,2931 2311,2968
  rectangle net GND: 2200,3226 2564,3273
  rectangle net GND: 2117,2827 2238,3273
  rectangle net VCC_3V3: 1225,3179 1276,3293
  rectangle net GND: 1705,2626 2183,3273
  region net GND: -108.7,3247 -108.7,3137.36 ccw(c-103.69,3137.36) -107.34,3133.92 ccw(c9,3181) 134.5,3181 ccw(c9,3181) 43.07,3301.79 ccw(c41.71,3296.96) 41.37,3301.97 ccw(c40.67,3297) 40.67,3302.02 -53.69,3302.02 ccw(c-53.69,3247)
  region net GND: 2636.7,3247 2636.7,3137.36 cw(c2631.69,3137.36) 2635.33,3133.92 cw(c2519,3181) 2393.5,3181 cw(c2519,3181) 2484.93,3301.79 cw(c2486.29,3296.96) 2486.63,3301.97 cw(c2487.33,3297) 2487.33,3302.02 2581.69,3302.02 cw(c2581.69,3247)
  region net GND: 2632.7,-62.49 2632.7,47.15 ccw(c2627.69,47.15) 2631.33,50.59 ccw(c2515,3.51) 2389.5,3.51 ccw(c2515,3.51) 2480.93,-117.28 ccw(c2482.29,-112.46) 2482.63,-117.46 ccw(c2483.33,-112.49) 2483.33,-117.51 2577.69,-117.51 ccw(c2577.69,-62.49)
  region net GND: -114.7,-65 -114.7,44.64 cw(c-109.69,44.64) -113.33,48.08 cw(c3,1) 128.5,1 cw(c3,1) 37.07,-119.79 cw(c35.71,-114.96) 35.37,-119.97 cw(c34.67,-115) 34.67,-120.02 -59.69,-120.02 cw(c-59.69,-65)
  pour cut-out: 1046.61,1575.06 1046.61,1152.66 1502.66,1152.66 1503,1153 1502,1154 1502,1574.43 1047.23,1574.43
Bottom Layer:
  rectangle net VCC_5V: -30,1094.97 208,1231
  rectangle net VCC_5V: 207,261.74 416.56,334.43
  region net GND: 48.97,289.53 48.97,383.53 -74.03,383.53 -74.03,289.53
  region net GND: 48.97,624.53 48.97,718.53 -74.03,718.53 -74.03,624.53
  region net GND: 67.16,1623.68 67.16,1717.68 -73.03,1717.68 -73.03,1623.68
  region net GND: 66.16,2048.26 66.16,2142.26 -75.03,2142.26 -75.03,2048.26
  region net GND: 47.97,2574.11 47.97,2668.11 -75.03,2668.11 -75.03,2574.11
  region net VCC: 1422,2158 587.35,2158 587.35,2116 1422,2116
  rectangle net NetLED3_1: 481,2116 557,2158
  rectangle net VCC_5V: 284,-43 422,205
  rectangle net GND: 465,358 562,418
  rectangle net GND: 528,-88.08 657,418
  rectangle net GND: 960,-88.08 1277,194.13
  rectangle net VCC_3V3: 2447,1238.45 2570,1330.71
  rectangle net VCC_3V3: 2447,380.94 2570,473.2
  rectangle net GND: 2218,-108 2562.34,174.21
  rectangle net VCC_3V3: 2544,385.83 2570,2177
  rectangle net GND: 1614,385.83 1746,440
  rectangle net GND: 1513,385.83 1690,440
  rectangle net GND: 1513,385.83 1590,610
  rectangle net VCC_3V3: 2273,2013 2570,2188
  rectangle net GND: -101,-100 -63,3285
  rectangle net GND: -92,-108 601,-58
  rectangle net GND: 580,-108 1847,-58.34
  rectangle net GND: 1377,-108 2562,-64.12
  rectangle net GND: -93,2979 50.02,3252
  region net GND: 50.02,2905.53 50.02,2999.53 -75.03,2999.53 -75.03,2905.53
  rectangle net GND: 290.57,3141.19 390.57,3264.19
  rectangle net GND: 610,3143 710,3266
  rectangle net GND: -93,3249 2609,3285
  rectangle net VCC_3V3: 1261,3175 2252,3230

## Silkscreen, mask and mechanical layers (free items; w line width, h text height)
Top Overlay:
  lines w10: 482,823 552,823 562,833 562,906 ; 483,881 513,881 521,889 521,907 ; 671,899 671,823 680,814 692,814 ; 1020,746 1076,746 1098,768 1098,830 ; 1132,1922 1184,1922 1196,1934 1196,1991
  text "BLE_LED" at 1067,3052 h75
  text "NEXTION TESTING" at -608,2964 h70
  text "WEIGHT SENSOR" at 463,2937 h70
  text "#" at 1185,2820 h60
  text "$" at 1186,2762 h60
  text "#" at 290,2741 h60 r180
  text "$" at 1408.93,2709 h60
  text "$" at 312,2708 h60
  text "OS TESTING" at 129,2419 h70
  text "$" at 1191,2281 h60
  text "#" at 1290.46,2215 h60 r180
  text "PWR_LED" at 269,2190 h75
  text "#" at 1290.46,2161.37 h60 r180
  text "$" at 1263,2064 h60
  text "RFID TRAY" at 2034,2049 h70
  text "OPTICAL SENSOR" at 128,1992 h70
  text "$" at 1224.97,1880 h60
  text "RST2" at 2017,1774 h75
  text "$" at 1634,1711 h60
  text "SS2" at 2059.09,1669 h75
  text "SERVO_2" at 137,1589 h70
  text "RST1" at 2024.47,1567 h75
  text "SS1" at 2066.56,1468 h75
  text "SERV0_2 TESTING" at 127,1238 h70
  text "RFID TRAY" at 2034,1191.49 h70
  text "SERVO_1" at 136,1143 h70
  text "#" at 839,1051 h60 r180
  text "#" at 1114.61,1048.86 h60 r180
  text "$" at 761,1017 h60
  text "RFID CONTAINER" at 1980,997 h70
  text "$" at 1181.72,907 h60
  text "FAULT" at 259,879 h75
  text "CHRG" at 282,775 h75
  text "$" at 1819,581.09 h60
  text "SERVO TESTING" at 126,471 h70
  text "RGB TESTING" at 127,313 h70
  text "BATTERY" at 1133,179 h70
  text "USB" at 1458,123.54 h70
  text "RGB" at 279,122.52 h70
  text "POWER SWITCH" at 712,122.59 h70
  text "+VE" at 1274,123 h50
  text "RFID TESTING" at 1872.39,122.59 h70
  text "-VE" at 1133,122 h50
Bottom Overlay:
  drawing of 3082 lines, arcs and shapes, not listed
  text "$" at 1673,3190 h60
  text "TX2" at 277,3086 h70
  text "GND" at 277,3017 h70
  text "GND" at 639.97,2993.67 h70 r270
  text "$ >> 0.1uf" at 2627,2954 h80
  text "IN_PA" at 841,2948 h70 r270
  text "IN_NA" at 740,2945 h70 r270
  text "GND" at 182.85,2918.54 h70
  text "AVDD#" at 536,2918 h70 r270
  text "# >> 10uf" at 2627,2883 h80
  text "RX2" at 164,2820 h70
  text "GND" at 2433.95,2711 h70
  text "SS2" at 2429.95,2614 h70
  text "RST2" at 2613,2605 h70 r90
  text "GND" at 182.85,2587.12 h70
  text "OP_SNS" at 298.14,2501 h70
  text "$" at 1265,2498 h60
  text "SCK" at 2613,2411 h70 r90
  text "MOSI" at 2429.95,2307.43 h70
  text "3.3 V" at 215.4,2271 h70
  text "MISO" at 2429.95,2217.43 h70
  text "OP_SNS" at 315.33,2172 h70
  text "3.3 V" at 2433.95,2115 h70
  text "GND" at 201,2072 h70
  text "GND" at 2433.95,1850.49 h70
  text "#SERVO-2" at 376,1843 h70
  text "SS3" at 2433.95,1753.49 h70
  text "5 V" at 159,1742 h70
  text "GND" at 204,1650 h70
  text "RST2" at 2433.95,1648.62 h70
  text "SCK" at 2433.95,1550.19 h70
  text "MOSI" at 2433.95,1446.92 h70
  text "GND" at 178.57,1426 h70
  text "MISO" at 2433.95,1356.92 h70
  text "SNS_3" at 239.57,1327 h70
  text "ZERO CARBON FOOTPRINT" at 1210,1289 h38
  text "3.3 V" at 2433.95,1254.49 h70
  text "5 V" at 157.58,1071 h70
  text "GND" at 2436.95,994.98 h70
  text "#SERVO-0" at 373.58,975.1 h70
  text "SS1" at 2436.95,896.98 h70
  text "GND" at 194.16,888.48 h70
  text "RST1" at 2436.95,795.39 h70
  text "SCK" at 2436.95,694.41 h70
  text "GND" at 184,652.14 h70
  text "MOSI" at 2436.95,590.41 h70
  text "SNS_2" at 245,553.14 h70
  text "MISO" at 2436.95,500.41 h70
  text "3.3 V" at 2436.95,397.98 h70
  text "$" at 1685,349 h60
  text "GND" at 184,317.14 h70
  text "VBAT_IN" at 1350.79,309.85 h70 r90
  text "VCC_IN" at 821,281 h70 r90
  text "#RGB" at 502.9,240.79 h70 r90
  text "SNS_1" at 238,218 h70
  text "GND" at 597.46,203.86 h70 r90
  text "GND" at 1044.46,195.33 h70 r90
  text "VCC" at 945,192 h70 r90
  text "GND" at 1256.24,181.18 h70 r90
  text "5 V" at 400.88,162.13 h70 r90
  text "MOSI" at 2041.57,48.85 h70 r270
  text "SCK" at 2145.57,48.85 h70 r270
  text "GND" at 2238.57,47.85 h70 r270
  text "MISO" at 1951.57,46.85 h70 r270
Mechanical 2:
  lines w10: -113,-67 ccw(c-63,-67) -63,-117 -56,-117 102,-117 2427,-117 2585,-117 ; -113,-66 -115,76 -115,3251 cw(c-65,3251) -65,3301 100,3301 2585,3301 cw(c2585,3251) 2635,3251 ; 2587,-117 ccw(c2587,-67) 2637,-67 2637,66.17 2637,3108 2635,3253

## Dimensions
-65,3301 to 102,-117 on Mechanical 1
-115,3251 to 2635,3253 on Mechanical 1